# Altium PCB BetaBake_REV_1.0.PcbDoc (part 4 of 8)
Units mil, origin at the board's own origin, x right, y up, seen from the top; angles counter-clockwise.
Board outline 6000 x 4000 mil, 8 copper layers (USB 2.0 (90 Diff) DDR3 Data (50-100), GND (Top Layer high-speed return paths), DDR3 Fly-by Routing (Address, Command, Control), QSPI Flash (Clk, IO), Int4 PWR, Int5 GND (Shielding between L4 and L6), Int6 eMMC High-Speed Data Lines (8-bit bus), SDIO/peripherals, Int7 GND, Escapes, non-critical tracks, decoupling capacitor vias), stack 60.424 mil thick; 426 components, 331 nets, 1941 pads, 428 vias.
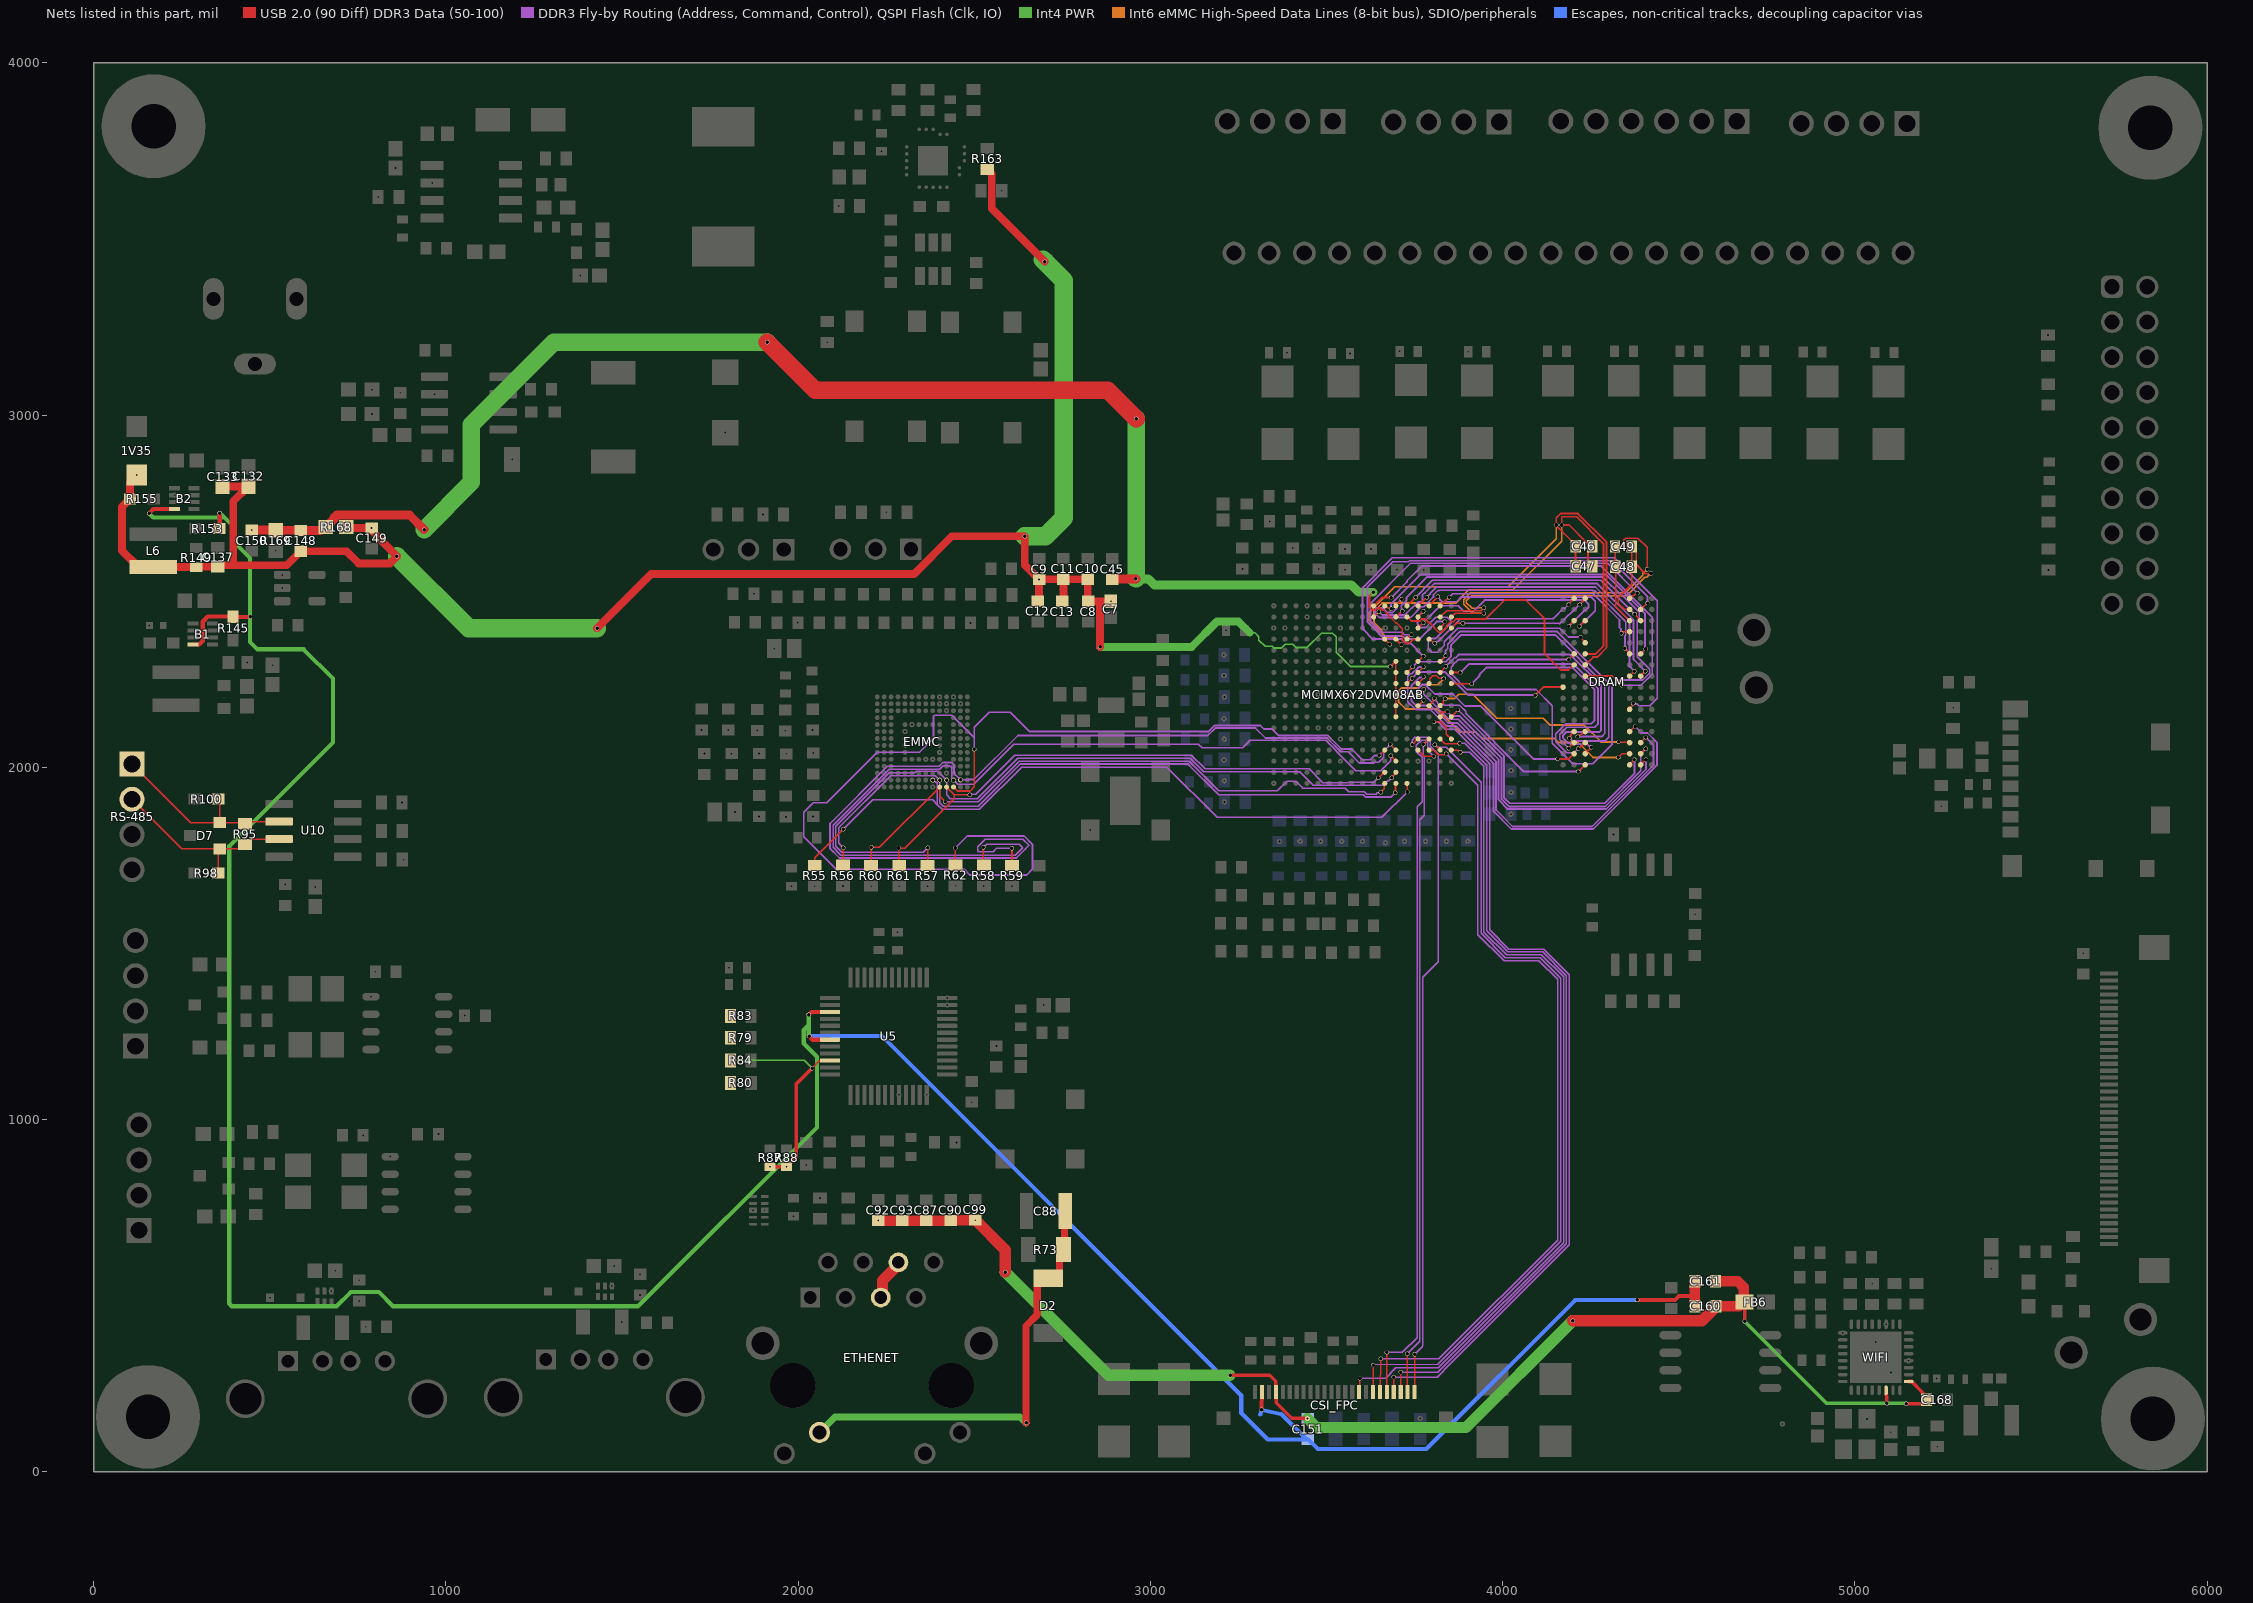
[diagram p9: the nets of this part, all layers, seen from the top]

## Part data (continued)
U13: library part CMP-04919-000038-1, "IC SUPERVISOR 4 CHANNEL 20QFN", Case/Package=QFN, Max Operating Temperature=125°C, Max Output Current=1mA, Max Power Dissipation=2.86W, Max Reset Threshold Voltage=404mV, Max Supply Voltage=6.5V, Min Operating Temperature=-40°C, Min Reset Threshold Voltage=396mV, Min Supply Voltage=1.8V, Nominal Supply Current=13uA, Number of Voltages Monitored=4, Overvoltage Threshold=400mV, Package Quantity=1, Quiescent Current=12uA, Accuracy=0.25%, Height=0.95mm, Lead Free="Lead Free", Length=4.15mm, Mount="Surface Mount", Number of Pins=20, Operating Supply Current=13uA, Packaging="Tape and Reel", Power Dissipation=2.86W, Radiation Hardening=No, REACH SVHC="No SVHC", Reset="Active Low", RoHS Compliant=Yes, Termination=SMD/SMT, Threshold Voltage=400mV, Type="Multi-Voltage Supervisor", Watchdog Timer=Yes, Width=4.15mm
U14: library part CMP-0332-00499-1, "Low Quiescent Current, Programmable-Delay Supervisory Circuit, 1 Supply Monitored, -40 to 125 degC, 6-pin SOT-23 (DBV), Green (RoHS & no Sb/Br)", Manufacturer="Texas Instruments", PartNumber=TPS3808G33DBVTG4, Rating=Catalog, Threshold Voltage 1 (typ)(Typ)(V)=3.07, # of supplies monitored=1, Code_JEDEC=MO-178-AB*, ComponentLink1Description=Datasheet, ComponentLink1URL=http://www.ti.com/general/docs/lit/getliterature.tsp?genericPartNumber=TPS3808G33&fileType=pdf, DatasheetVersion=SBVS050J, Iq(Typ)(uA)=2.4, Mounting Technology="Surface Mount", Output Driver Type / Reset Output="Active-low, Open-drain", PackageDescription="6-Pin Plastic Small-Outline Package, 2.9 x 1.6 mm Body, 0.95 mm Pitch, 2.8 mm Lead Span", PackageReference=DBV6, PackageVersion="revK, Mar-2006", Reset Threshold Accuracy(%)=0.5, SubFamily="Supervisor and Reset IC", Time Delay(ms)=Programmable, VCC(Max)(V)=6.5, VCC(Min)(V)=1.7
U16: library part W25Q32JVSSIQ, "FLASH - NOR Memory IC 32Mb (4M x 8) SPI - Quad I/O 133 MHz 8-SOIC", Package="SOIC-8 Winbond", Check_prices=https://www.snapeda.com/parts/W25Q32JVSSIQ/Winbond+Electronics/view-part/?ref=eda, MF=Winbond, MP=W25Q32JVSSIQ, SnapEDA_Link=https://www.snapeda.com/parts/W25Q32JVSSIQ/Winbond+Electronics/view-part/?ref=snap
U17: "300-mA, high-PSRR, low-IQ, low-dropout voltage regulator with enable", Package="SOT-23-5 Texas Instruments", Check_prices=https://www.snapeda.com/parts/TLV70218DBVT/Texas+Instruments/view-part/?ref=eda, MF="Texas Instruments", MP=TLV70218DBVT, SnapEDA_Link=https://www.snapeda.com/parts/TLV70218DBVT/Texas+Instruments/view-part/?ref=snap
WIFI: library part CMP-2000-07453-1, "Low-Power, Highly-Integrated Wi-Fi Solution, 2.5 to 3.6 V, 80 mA, -40 to 125 degC, 32-Pin QFN", Manufacturer="Espressif Systems", Package Description="32-Pin Quad Falt No-Lead, Body 5 x 5 mm, Pitch 0.5 mm", Package Reference=QFN-32, Datasheet URL=http://espressif.com/sites/default/files/documentation/0a-esp8266ex_datasheet_en.pdf, Datasheet Version="Rev. 5.4, 04/2017", Manufacturer URL=http://espressif.com, Mounting Technology=SurfaceMount
Y1: library part ECS-.327-6-34RR-TR, "32.768kHz 20ppm Crystal 6pF 20 kOhm -40C ~ 85C Surface Mount 2-SMD, No Lead 3.2 x 1.5", Package="ECX-34RR-34RR-2 ECS", Check_prices=https://www.snapeda.com/parts/ECS-.327-6-34RR-TR/ECS/view-part/?ref=eda, MF="ECS Inc.", MP=ECS-.327-6-34RR-TR, SnapEDA_Link=https://www.snapeda.com/parts/ECS-.327-6-34RR-TR/ECS/view-part/?ref=snap
Y3: library part CMP-27762-015775-1, "Crystal 26MHz ±20ppm (Tol) ±30ppm (Stability) 18pF FUND 60Ω 4-Pin SMD T/R", Case/Package=CSMD, ESR (Equivalent Series Resistance)=60R, Frequency=26MHz, Frequency Stability=30ppm, Frequency Tolerance=20ppm, Load Capacitance=18pF, Max Operating Temperature=85°C, Min Operating Temperature=-40°C, Operating Frequency="26 MHz", Package Quantity=1000, Depth=2.5mm, Height=1mm, Lead Free="Lead Free", Length=3.2mm, Mount="Surface Mount", Packaging="Tape and Reel", Series=ABM8G, Termination=SMD/SMT, Tolerance=20ppm, Width=2.5mm

## Free pads (board coordinates)
  round 15 hole 5: 18(544,1667.06) 19(629,1660.16) 21(879.99,1738) 22(875.53,1900) 23(799.47,1420) 24(787,1349) 27(765,955) 28(841.65,895) 29(286.54,1910) 33(436,2298) 34(508,2290.16) 36(158,2403) 43(449,2673.53) 45(535,2546.4) 46(535,2546.4) 49(685.94,571) 50(754,544.06) 54(1499.12,425) 55(1477.94,584) 56(1551.18,561.02) 57(1807.8,1104.17) 58(1807.33,1168.17) 59(1807.33,1232.17) 60(1807.33,1294.17) 61(1987,725.41) 62(2062,777.53) 67(2449.46,935) 69(2423.07,1344.93) 71(2697.43,1325) 73(2286.26,1070.32) 74(1803.41,1431) 75(1981,1662.41) 76(1981,1662.41) 77(2047.12,1662.7) 78(2127.12,1663.17) 79(2207.12,1662.7) 80(2207.12,1662.7) 81(2287.12,1662.7) 82(2367.12,1662.7) 83(2447.12,1663.65) 84(2527.12,1663.17) 85(2607.12,1662.7) 86(2042.17,1860.66) 87(1965.17,1859.13) 88(1889.12,1860.65) 89(1820.37,1872.91) 90(2043.07,2040.74) 92(1963.12,2103.7) 93(1966.07,2038.27) 94(1889.12,2039.23) 95(1884.12,2104.7) 96(1810.8,2038.91) 97(1801.8,2106.38) 98(1725.8,2106.38) 99(1733.8,2038.96) 100(1932,2337) 101(1932,2337) 103(1999,2411) 107(1874.21,2493) 113(2489.21,2410) 117(2684,2533.47) 123(2888,2471.33) 124(789.91,3003.37) 125(789.91,3072.27) 126(870,3063.53) 127(967.76,3059) 130(1793,2950.37) 131(807.47,3619) 132(960.78,3659) 133(857,3701.42) 134(1381,3396) 165(5234,71.47) 180(789,2679.53) 183(122,2830.1) 186(1920,866.41) 187(1967,866.41) 189(5548,3227.53) 190(5550,2560.47) 192(5279,2169.53) 193(5245,1889.47) 196(5648,1472.06) 206(5387,576.45) 211(4794,136) 218(2503,714.47) 222(2227,713.47) 227(4314.68,1809.36) 229(4547,1583) 233(5148,3828) 242(2829,1822) 244(772.47,412) 245(978.53,959) 248(3766,151.53) 249(5088.53,418.81) 251(5152.5,315.46) 252(2249.86,2724.17) 253(2082.68,3206.69) 254(1899.8,2718.17) 255(2115.47,3594) 256(3737,3460) 257(3707.41,3181) 258(3566.59,3175) 259(3387.59,3177) 260(4137,3460) 261(4737,3460) 262(5137,3460) 266(3989.9,3832.06) 267(4665,3834) 268(3518,3834) 269(3902.41,3180) 270(2236.61,3749) 271(2578.06,3637) 272(3446,151.06) 273(229.86,2772.68) 279(1188.07,2874) 280(1053.15,1295.28) 282(2284.5,594.74) 283(2401.6,2200.08) 285(2421.29,2160.7) 286(2440.97,2200.08) 287(2421.29,2180.39) 293(2041,2106) 294(2322.86,2121.33) 295(2303.18,2101.65) 296(2401.6,2042.59) 298(2381.92,2022.91) 302(3700.24,2560.98) 305(3776.24,2559.98) 306(3478.24,2562.93) 307(3478.24,2562.93) 309(3626.24,2560.98) 310(3552.24,2560.98) 311(3261.46,2563.36) 312(3338.47,2698) 314(4965.5,394.2) 315(3476.26,2332.47) 318(3476.26,2112) 321(3476.26,2206.49) 323(4023.76,1928.98) 324(3759.72,2017.51) 329(3901.24,1790.46) 330(3840.24,1790.46) 331(3781.24,1790.46) 332(3721.24,1790.46) 333(3667.24,1785.98) 334(3602.24,1789.98) 335(3543.24,1789.98) 336(3483.24,1790.46) 337(3425.24,1790.46) 338(3366.24,1789.46) 339(4023.53,1867) 340(4023.53,1991) 341(4023.53,2050) 342(4023.53,2109) 343(4023.06,2167) 347(3507.76,2143.5) 348(3507.76,2112) 349(3539.83,2080.5) 351(2023,870.72) 352(1904.87,742.37) 353(1872,742.37) 354(2493,1049.47) 355(2365,1070.32) 356(2563,1209.06) 358(2423.07,1325.24) 359(2282,1531.59) 360(3854.21,1954.52) 361(3791,2017.73) 362(754,485) 363(674.68,513.16) 364(500.69,494) 365(5232.5,264.83) 366(5049.06,534.06) 367(5059,368.61) 368(5102.31,282) 372(2362.23,2022.91) 373(2421.29,1983.54) 374(2381.92,1944.17) 377(2460.66,2180.39) 378(2401.6,2180.39) 379(3413.27,2017.51) 380(3350.28,1954.52) 382(3665.24,2332.47) 383(3539.25,2395.46) 384(3667.56,2395.44) 385(3728.23,2332.47) 386(3728.23,2395.46) 387(3214.82,2389) 388(3208.47,2319) 389(3350.28,2395.46) 390(3381.77,2395.46) 391(3350.28,2458.46) 392(3444.76,2426.96) 393(3444.76,2458.46) 394(3404.24,2623.04) 395(3478.24,2621.98) 396(3552.24,2620.04) 397(3626.24,2620.04) 398(517,2615) 399(535,2509) 400(3208.94,2261) 401(3210,2200) 402(3208.94,2137.99) 403(3209.71,2079.98) 404(3208.94,2020.98) 405(3209.71,1961.98) 406(3210.18,1901.98) 407(5102,112.61) 408(5034.46,150.31) 409(1551.18,501.97) 410(1471,527.32)
  round 12 hole 5: 381(3539.25,2017.51)
  round 295.28 hole 125.98: 411(5839,3816) 412(170,3820) 413(154,156) 414(5846,151)

## Via types
v1: diameter 12, hole 10, USB 2.0 (90 Diff) DDR3 Data (50-100) to Escapes, non-critical tracks, decoupling capacitor vias, 382 vias
v2: diameter 50, hole 26, USB 2.0 (90 Diff) DDR3 Data (50-100) to Escapes, non-critical tracks, decoupling capacitor vias, 28 vias
v3: diameter 19.68, hole 7.87, USB 2.0 (90 Diff) DDR3 Data (50-100) to Escapes, non-critical tracks, decoupling capacitor vias, 9 vias
v4: diameter 23.62, hole 11.81, USB 2.0 (90 Diff) DDR3 Data (50-100) to Escapes, non-critical tracks, decoupling capacitor vias, 5 vias
v5: diameter 7.87, hole 7.87, USB 2.0 (90 Diff) DDR3 Data (50-100) to Escapes, non-critical tracks, decoupling capacitor vias, 4 vias

## Nets (pads, with @x,y where several pads share a name; then routed paths per layer and width w, separated by ;. In a path a pad name is that pad's centre, name@x,y a point inside that pad or via, vN(x,y) a via of type N, cw(c..) or ccw(c..) an arc to the next point about the centre after c; other vN are vias at no path point)
A: D7.2 R95.2 R100.1 RS-485.1 U10.6 | length 560.7
  USB 2.0 (90 Diff) DDR3 Data (50-100) w4: RS-485.1@108.74,2009.45 274.79,1843.4 D7.2@357.37,1843.4 ; R100.1@351.5,1910 R100.1@353.46,1910 357.37,1906.09 D7.2@357.37,1843.4 ; U10.6@526.5,1846.14 436.14,1846.14 R95.2@430,1840 426.6,1843.4 D7.2@357.37,1843.4
AGND: B1.4 B2.4 C151.1 C160.1 C161.2 CSI_FPC.2 R145.1 R153.1 U5.15 U5.19 | length 9065
  USB 2.0 (90 Diff) DDR3 Data (50-100) w12: v1(157,2721) 169.31,2733.31 B2.4@229.86,2733.31 ; B1.4@281.86,2349 281.95,2349.09 299.65,2349.09 309.42,2358.86 309.42,2413.46 323.88,2427.93 R145.1@396,2427.93 396.93,2427 v1(444,2427) ; R153.1@356.46,2678 358,2679.54 v1(358,2722) ; v1(2030,1298) 2037.56,1305.56 U5.15@2090.39,1305.56 ; v1(2031.17,1237.08) 2041.43,1226.82 U5.19@2090.39,1226.82 ; v1(3315.35,176) CSI_FPC.2@3316.94,227 ; v1(4382,488) 4489.25,488 4500.78,499.53 4545.92,499.53
  USB 2.0 (90 Diff) DDR3 Data (50-100) w30: C161.2@4545.69,541 4545.92,540.76 4545.92,499.53 C160.1@4545.92,470
  Int4 PWR w12: v1(157,2721) 169,2709 371,2709 ; v1(358,2722) 371,2709 ; v1(2030,1298) 2030,1268.12 ; v1(2031.17,1237.08) 2030,1238.25 2030,1268.12 ; 371,2709 395,2685 395,2643 444,2594 v1(444,2427) 444,2356 465,2335 596,2335 679,2252 679,2071 385,1777 385,477.03 392.03,470 689.51,470 730.01,510.5 809.5,510.5 850,470 1545.51,470 2053.37,977.86 2053.37,1178.31 2016,1215.68 2016,1254.12 2030,1268.12
  Escapes, non-critical tracks, decoupling capacitor vias w12: v1(2031.17,1237.08) 2237.92,1237.08 3257.84,217.16 3257.84,167.16 3333,92 C151.1@3444.03,92 ; 3311.97,163.03 v1(3315.35,176) 3369.61,163.79 cw(c3366.98,152.08) 3375.46,160.57 C151.1@3444.03,92 ; v1(4382,488) 4206.31,488 3782.97,64.67 3475.3,64.67 3447.97,92 C151.1@3446,92 C151.1@3444.03,92
AVDD: C87.1 C90.2 C92.2 C93.2 C99.2 C151.2 C160.2 C161.1 C168.2 CSI_FPC.4 ETHENET.5 ETHENET.6 FB6.2 pad.57 pad.58 pad.59 pad.60 pad.186 pad.187 pad.218 pad.222 pad.272 pad.282 R79.1 R80.1 R83.2 R84.2 R87.2 R88.2 U5.22 WIFI.1 WIFI.30 | length 4623.2
  USB 2.0 (90 Diff) DDR3 Data (50-100) w4: v1(2039.37,1145.67) 2059.06,1165.35 2087.98,1165.35 U5.22@2090.39,1167.76
  USB 2.0 (90 Diff) DDR3 Data (50-100) w10: R87.2@1920,866.41 R88.2@1967,866.41 1994.85,894.26 1994.85,898.4 1994.85,1068 1994.85,1101.15 v1(2039.37,1145.67) ; v1(3226,274) 3339,274 3356.31,256.68 CSI_FPC.4@3356.31,227 3357.22,226.09 3357.22,195.78 3401,152 3445.06,152 pad.272@3446,151.06 ; v1(4686.68,427.09) 4686.68,481.78 FB6.2@4686.89,482 ; WIFI.30@5088.53,231.8 5088.61,231.72 5088.61,217.08 5090.62,215.07 5090.62,194.52 v1(5091,194.14) ; v1(5146,193) 5192.72,193 5203.47,203.75 C168.2@5203.47,204 5192.72,214.75 5192.72,224.89 5161.2,256.41 WIFI.1@5152.5,256.41
  USB 2.0 (90 Diff) DDR3 Data (50-100) w30: C92.2@2227,713.47 2227.47,713 C93.2@2295,713 C87.1@2364,713 2364.24,713.24 2432.76,713.24 C90.2@2433,713.47 2433.75,714.22 2495.72,714.22 2495.97,714.47 C99.2@2503,714.47 ; C161.1@4604.74,541 4667,541 4684.57,523.43 4684.57,484.32 FB6.2@4686.89,482 4682.01,482 4670.01,470 C160.2@4605.21,470
  USB 2.0 (90 Diff) DDR3 Data (50-100) w32: ETHENET.5@2234.5,494.74 2239.1,499.33 2239.1,542.84 2284.5,588.25 ETHENET.6@2284.5,594.74 ; C99.2@2503,714.47 2588,629.47 v1(2588,567) ; v1(4199,429) 4565.68,429 4605.21,468.54 C160.2@4605.21,470
  Int4 PWR w4: pad.58@1807.33,1168.17 2016.87,1168.17 v1(2039.37,1145.67)
  Int4 PWR w10: v1(4686.68,427.09) 4919.62,194.14 v1(5091,194.14) 5144.32,194.14 5145.46,193 v1(5146,193)
  Int4 PWR w32: v1(2588,567) 2881,274 v1(3226,274) ; pad.272@3446,151.06 3471.03,126.03 3896.03,126.03 v1(4199,429)
B: D7.1 R95.1 R98.1 RS-485.2 U10.7 | length 557.7
  USB 2.0 (90 Diff) DDR3 Data (50-100) w4: RS-485.2@108.74,1909.45 249.59,1768.6 D7.1@357.37,1768.6 ; R98.1@353.46,1700 353.46,1764.69 D7.1@357.37,1768.6 ; U10.7@526.5,1796.14 449.13,1796.14 433.94,1780.94 R95.1@430,1780.94 417.65,1768.6 D7.1@357.37,1768.6
"Chassis GND": C88.2 D2.2 ETHENET.10 R73.2 | length 1278
  USB 2.0 (90 Diff) DDR3 Data (50-100) w20: v1(2647,139) 2647,414.4 2678.66,446.06 2678.66,535 2693.66,550 D2.2@2710,550 2726.34,550 2742.53,566.19 2742.53,620.33 R73.2@2753.2,631 2755.66,633.46 2755.66,737.54 C88.2@2758.12,740
  Int4 PWR w20: ETHENET.10@2060.5,111.74 2104.76,156 2630,156 v1(2647,139)
CSI_DATA0: CSI_FPC.24 MCIMX6Y2DVM08AB.E4 | length 1981.6
  USB 2.0 (90 Diff) DDR3 Data (50-100) w4: v1(3743,2064) 3743.11,2064 3759.61,2080.5 MCIMX6Y2DVM08AB.E4@3759.72,2080.5 ; CSI_FPC.24@3750.02,227 v1(3750,334)
  DDR3 Fly-by Routing (Address, Command, Control), QSPI Flash (Clk, IO) w4: v1(3743,2064) 3743,2077 3751,2085 3786.55,2085 3795,2076.55 3795,2059.34 3817,2037.34 3817,1447.72 3772.91,1403.63 3772.91,358.56 cw(c3768.91,358.56) 3771.74,355.74 v1(3750,334)
CSI_DATA1: CSI_FPC.23 MCIMX6Y2DVM08AB.E3 | length 1881.9
  USB 2.0 (90 Diff) DDR3 Data (50-100) w4: v1(3729,335) 3729.66,334.34 3729.66,227.67 CSI_FPC.23@3730.33,227 ; v1(3775,2065) 3775.36,2065 3790.86,2080.5 MCIMX6Y2DVM08AB.E3@3791.22,2080.5
  DDR3 Fly-by Routing (Address, Command, Control), QSPI Flash (Clk, IO) w4: v1(3729,335) 3763.74,369.74 ccw(c3760.91,372.56) 3764.91,372.56 3764.91,454.59 3764.91,1851.91 3777.22,1864.22 3777.22,2031.14 3775,2033.37 v1(3775,2065)
CSI_DATA2: CSI_FPC.22 MCIMX6Y2DVM08AB.E2 | length 2351.4
  USB 2.0 (90 Diff) DDR3 Data (50-100) w4: CSI_FPC.22@3710.65,227 3711,244.69 v1(3711,283) ; MCIMX6Y2DVM08AB.E2@3822.72,2080.5 3836,2067.22 3876.36,2067.22 v1(3877.83,2068.69)
  DDR3 Fly-by Routing (Address, Command, Control), QSPI Flash (Clk, IO) w4: v1(3711,283) 3816.36,283 3846.68,313.32 4181,647.64 4181,1408.36 4113.36,1476 4014.63,1476 3955,1535.63 3955,2006.34 3892.67,2068.67 v1@3877.86,2068.67
CSI_DATA3: CSI_FPC.21 MCIMX6Y2DVM08AB.E1 | length 2500
  USB 2.0 (90 Diff) DDR3 Data (50-100) w4: CSI_FPC.21@3690.96,227 v1(3691,269) ; v1(3805,2129) 3824.5,2129 3840.2,2113.3 3840.2,2094.51 MCIMX6Y2DVM08AB.E1@3854.21,2080.5
  DDR3 Fly-by Routing (Address, Command, Control), QSPI Flash (Clk, IO) w4: v1(3691,269) 3813.67,269 3852.33,307.67 4189,644.33 4189,1411.67 4116.67,1484 4017.94,1484 3963,1538.94 3963,2009.65 3864,2108.65 3837.45,2108.65 3817.11,2129 v1(3805,2129)
CSI_DATA4: CSI_FPC.20 MCIMX6Y2DVM08AB.D4 | length 2049.3
  USB 2.0 (90 Diff) DDR3 Data (50-100) w4: 3670.89,325 3671.2,244.69 CSI_FPC.20@3671.28,227 ; 3670.89,325.05 v1(3671,339) ; MCIMX6Y2DVM08AB.D4@3759.72,2048.87 MCIMX6Y2DVM08AB.D4@3759.72,2049.01 3777.73,2031 v1(3805,2031)
  DDR3 Fly-by Routing (Address, Command, Control), QSPI Flash (Clk, IO) w4: v1(3671,339) 3715,339 3756.91,380.91 3756.91,391.56 3756.91,457.91 3756.91,1888.42 3771.22,1902.74 3771.22,2028.66 3755.15,2044.73 3755.15,2062.12 3770.03,2077 3779.97,2077 3787,2069.97 3787,2049 v1(3805,2031)
CSI_DATA5: CSI_FPC.19 MCIMX6Y2DVM08AB.D3 | length 2364.9
  USB 2.0 (90 Diff) DDR3 Data (50-100) w4: CSI_FPC.19@3651.59,227 3651.85,227.26 ccw(c3649.02,230.08) 3653.02,230.04 v1(3654,321) ; MCIMX6Y2DVM08AB.D3@3791.22,2046.89 MCIMX6Y2DVM08AB.D3@3791.22,2049.01 3805.99,2049.01 3809.43,2045.57 3809.43,2043.51 3817.21,2035.72 3834.5,2035.72 3837.88,2039.1 v1(3840.05,2039.1)
  DDR3 Fly-by Routing (Address, Command, Control), QSPI Flash (Clk, IO) w4: v1(3654,321) 3819,321 3829,331 4156,658 4156,1398 4103,1451 4004.27,1451 3930,1525.27 3930,1949.32 3850.03,2029.29 ; v1(3840.05,2039.1) 3849.99,2029.32
CSI_DATA6: CSI_FPC.18 MCIMX6Y2DVM08AB.D2 | length 2406.3
  USB 2.0 (90 Diff) DDR3 Data (50-100) w4: CSI_FPC.18@3631.91,227 3631.95,227.05 v1(3632,303) v1(3632,303) ; v1(3807,2064.31) 3807.21,2064.31 3822.51,2049.01 MCIMX6Y2DVM08AB.D2@3822.72,2049.01
  DDR3 Fly-by Routing (Address, Command, Control), QSPI Flash (Clk, IO) w4: v1@3631.99,304.11 3814.38,305.27 ccw(c3814.34,309.27) 3817.17,306.44 3835.36,324.64 4165,654.27 4165,1401.73 4106.73,1460 4008,1460 3939,1529 3939,1957.39 3839.61,2056.79 3815.38,2056.79 3807.85,2064.31 v1(3807,2064.31)
CSI_DATA7: CSI_FPC.16 MCIMX6Y2DVM08AB.D1 | length 2391.8
  USB 2.0 (90 Diff) DDR3 Data (50-100) w4: CSI_FPC.16@3592.54,227 3593.85,228.31 3593.85,251 cw(c3597.85,251) 3593.86,251.33 v1(3595,265) ; MCIMX6Y2DVM08AB.D1@3854.21,2049.01 3871.83,2049.01 3877.84,2043 v1(3880,2043)
  DDR3 Fly-by Routing (Address, Command, Control), QSPI Flash (Clk, IO) w4: v1(3595,265) 3596,266 3668,266 3697,295 3817.04,295 3841.02,318.98 4173,650.96 4173,1405.04 4110.04,1468 4011.31,1468 3947,1532.31 3947,1780.31 3947,2003 3907,2043 v1(3880,2043)
DRAM_1V35: 1V35.2 C7.1 C8.1 C9.1 C10.1 C11.1 C12.1 C13.1 C132.2 C133.2 C137.2 C148.2 C149.1 L6.2 MCIMX6Y2DVM08AB.G6 MCIMX6Y2DVM08AB.H6 MCIMX6Y2DVM08AB.J6 MCIMX6Y2DVM08AB.K6 MCIMX6Y2DVM08AB.L6 MCIMX6Y2DVM08AB.M6 pad.117 pad.123 pad.180 pad.183 R149.2 R155.2 R163.1 R168.2 | length 6676
  USB 2.0 (90 Diff) DDR3 Data (50-100) w4: C133.2@366,2797.42 C133.2@382.42,2781
  USB 2.0 (90 Diff) DDR3 Data (50-100) w5: v1@3680,2286 v1(3680.88,2286) 3681.32,2286 3696.29,2300.98 MCIMX6Y2DVM08AB.M6@3696.73,2300.98 MCIMX6Y2DVM08AB.L6@3696.73,2269.48 MCIMX6Y2DVM08AB.K6@3696.73,2237.98 MCIMX6Y2DVM08AB.J6@3696.73,2206.49 MCIMX6Y2DVM08AB.H6@3696.73,2174.99 MCIMX6Y2DVM08AB.G6@3696.73,2143.5
  USB 2.0 (90 Diff) DDR3 Data (50-100) w22: 1V35.2@122,2830.1 103,2811.1 R155.2@103,2762 80.42,2739.42 80.42,2615.35 127.07,2568.69 L6.2@169,2568.69 290.19,2568.69 R149.2@291,2567.88 292.54,2569.43 C137.2@352,2569.43 353.97,2569.43 358.07,2573.53 396,2573.53 ; C133.2@366,2797.42 C132.2@438,2797.42 ; C132.2@439,2798.42 C132.2@438,2797.42 ; R168.2@716.94,2682 719.41,2679.53 C149.1@789,2679.53 789,2672.32 819.72,2641.61 819.72,2640.28 v1(861,2599) 841,2579 752,2579 717.53,2613.47 C148.2@588,2613.47 548.06,2573.53 396,2573.53 ; v1(1429,2395) 1583,2549 2329.1,2549 2436.1,2656 v1(2643,2656) 2643,2574.47 C9.1@2684,2533.47 ; R163.1@2536.61,3697.59 2540.55,3697.59 2545.29,3692.84 2545.29,3688.91 2549.31,3684.89 2549.31,3586.69 v1(2700,3436) ; C12.1@2680,2472 2684,2476 C9.1@2684,2533.47 ; C13.1@2750,2471.53 2753,2474.53 C11.1@2753,2533.94 ; v1(2857,2342) 2857,2467.06 2852.53,2471.53 ; C7.1@2888,2471.33 2887.8,2471.53 2852.53,2471.53 ; 396,2573.53 396,2755.42 C132.2@438,2797.42 ; C9.1@2684,2533.47 2684.47,2533.94 C11.1@2753,2533.94 ; C11.1@2753,2533.94 2821.94,2533.94 C10.1@2822,2534 2822,2472.53 C8.1@2823,2471.53 2852.53,2471.53
  Int4 PWR w5: 3281.75,2382 3297,2382 3307.83,2371.17 3307.83,2361.33 3325.65,2343.5 3346,2343.5 3351,2338.5 3371.35,2338.5 3382.35,2349.5 3404.1,2349.5 3413.05,2340.55 3445.22,2340.55 3485.66,2380.99 3517.01,2380.99 3527.64,2370.36 3527.64,2327.11 3568.75,2286 v1(3680.88,2286)
  Int4 PWR w22: v1(2857,2342) 3116.91,2342 ; 3157,2382 3117,2342 3116.91,2342 ; 3281.75,2382 3249.75,2414 3188.91,2414 3116.91,2342
  Int4 PWR w52: v1(861,2599) 1065,2395 v1(1429,2395) ; v1(2643,2656) 2702,2656 2754,2708 2754,3382 v1(2700,3436) ; 2694,3442 v1(2700,3436) ; v1@2702,3436 v1(2700,3436)
DRAM_ADDR0: DRAM.N3 MCIMX6Y2DVM08AB.L5 | length 928.3
  USB 2.0 (90 Diff) DDR3 Data (50-100) w5.12: MCIMX6Y2DVM08AB.L5@3728.23,2269.48 3728.85,2269.48 3744.37,2285 v1(3745,2285) ; v1(4213.31,2087.24) DRAM.N3@4234.39,2101.75
  DDR3 Fly-by Routing (Address, Command, Control), QSPI Flash (Clk, IO) w5.12: v1(3745,2285) 3745,2286 3758.56,2299.56 3838.32,2299.56 3853.12,2314.36 3853.12,2346.22 3882.89,2376 4149,2376 4150.47,2374.53 4288.52,2236.48 cw(c4284.88,2232.88) 4290,2232.88 4290,2096 4281.24,2087.24 v1(4213.31,2087.24)
DRAM_ADDR1: DRAM.P7 MCIMX6Y2DVM08AB.H2 | length 614.4
  USB 2.0 (90 Diff) DDR3 Data (50-100) w5.12: MCIMX6Y2DVM08AB.H2@3822.72,2174.99 3831.25,2183.53 3831.25,2187.51 3836.94,2193.2 v1(3836.94,2195.06) ; v1(4329,2072) 4329.87,2071.13 4359.5,2071.13 DRAM.P7@4360.37,2070.25 DRAM.P7@4363.24,2070.25
  Int6 eMMC High-Speed Data Lines (8-bit bus), SDIO/peripherals w5.12: v1(3836.94,2195.06) 3863.34,2195.06 3875.96,2207.68 3915.27,2207.68 3983.61,2139.34 4115.3,2139.34 4134.66,2119.98 4231.57,2119.98 4279.55,2072 v1(4329,2072)
DRAM_ADDR2: DRAM.P3 MCIMX6Y2DVM08AB.K1 | length 801.7
  USB 2.0 (90 Diff) DDR3 Data (50-100) w5.12: MCIMX6Y2DVM08AB.K1@3854.94,2238.71 3854.94,2237.98 MCIMX6Y2DVM08AB.K1@3854.21,2237.98 3854.7,2237.49 3911.51,2237.49 v1(3912,2237) ; v1(4214,2053) 4215.57,2053 4232.82,2070.25 DRAM.P3@4234.39,2070.25
  DDR3 Fly-by Routing (Address, Command, Control), QSPI Flash (Clk, IO) w5.12: v1(3912,2237) 3934.16,2259.16 3934.16,2263.04 3955,2283.88 4198.12,2283.88 4261.16,2220.84 4261.16,2133.16 4252,2124 4179.21,2124 4151,2095.79 4151,2072.24 4182,2041.24 4202.24,2041.24 v1(4214,2053)
DRAM_ADDR3: DRAM.N2 MCIMX6Y2DVM08AB.M2 | length 887.3
  USB 2.0 (90 Diff) DDR3 Data (50-100) w5.12: MCIMX6Y2DVM08AB.M2@3822.72,2300.98 3822.72,2301.35 3838,2316.63 v1(3838,2317) ; v1(4189.28,2083.06) 4189.28,2084.92 4193.82,2089.46 4193.82,2092.61 DRAM.N2@4202.89,2101.75 DRAM.N2@4202.89,2101.75
  DDR3 Fly-by Routing (Address, Command, Control), QSPI Flash (Clk, IO) w5.12: v1(3838,2317) 3838,2331.43 3844,2337.43 3844,2350 3879.88,2385.88 4153.36,2385.88 4301,2238.24 4301,2086 4289.68,2074.68 4199.52,2074.68 4191.14,2083.06 v1(4189.28,2083.06)
DRAM_ADDR4: DRAM.P8 MCIMX6Y2DVM08AB.K4 | length 1208.7
  USB 2.0 (90 Diff) DDR3 Data (50-100) w5.12: MCIMX6Y2DVM08AB.K4@3759.72,2237.98 3759.85,2237.98 3773.68,2251.81 3773.68,2255.36 v1(3775,2256.68) ; DRAM.P8@4391.87,2070.25 4391.87,2070.56 4406,2084.69 v1(4406,2085)
  DDR3 Fly-by Routing (Address, Command, Control), QSPI Flash (Clk, IO) w5.12: v1(3775,2256.68) 3773.68,2255.36 3764.36,2255.36 3741,2232 3741,2221 3741,2189.44 3755.26,2175.17 3795.93,2175.17 3844.78,2126.33 3871.33,2126.33 3981.25,2016.41 3981.25,1878.81 4027.95,1832.12 4254.05,1832.12 4428.68,2006.74 4428.68,2062.32 v1(4406,2085)
DRAM_ADDR5: DRAM.P2 MCIMX6Y2DVM08AB.L1 | length 750.3
  USB 2.0 (90 Diff) DDR3 Data (50-100) w5.12: MCIMX6Y2DVM08AB.L1@3854.35,2269.48 MCIMX6Y2DVM08AB.L1@3854.21,2269.48 3854.45,2269.24 3879.76,2269.24 v1(3880,2269) ; v1(4187,2054) 4187,2054.18 4202.89,2070.07 DRAM.P2@4202.89,2070.25
  DDR3 Fly-by Routing (Address, Command, Control), QSPI Flash (Clk, IO) w5.12: v1(3880,2269) 3904,2293 4202,2293 4270.28,2224.72 4270.28,2122.28 4262,2114 4182.11,2114 4161.88,2093.78 4161.88,2079.12 v1(4187,2054)
DRAM_ADDR6: DRAM.R8 MCIMX6Y2DVM08AB.G2 | length 891.1
  USB 2.0 (90 Diff) DDR3 Data (50-100) w5.12: MCIMX6Y2DVM08AB.G2@3822.72,2143.5 3822.72,2151.5 cw(c3827.83,2151.46) 3826.72,2156.46 ccw(c3822.72,2174.99) 3828.16,2156.83 cw(c3829.59,2151.91) 3829.56,2157.03 3842.09,2157.03 v1(3843.41,2158.35) ; DRAM.R8@4391.87,2038.76 DRAM.R8@4391.87,2038.76 4406,2052.95 v1(4406,2053)
  DDR3 Fly-by Routing (Address, Command, Control), QSPI Flash (Clk, IO) w5.12: v1(3843.41,2158.35) 3856.31,2145.45 3878,2145.45 3996.33,2027.12 3996.33,1911.27 4018.91,1888.68 4290.49,1888.68 4391.84,1990.04 4391.84,2038.84 v1(4406,2053)
DRAM_ADDR7: DRAM.R2 MCIMX6Y2DVM08AB.H4 | length 603.7
  USB 2.0 (90 Diff) DDR3 Data (50-100) w5.12: MCIMX6Y2DVM08AB.H4@3759.72,2174.99 3759.86,2174.99 MCIMX6Y2DVM08AB.H4@3764.07,2179.21 ; MCIMX6Y2DVM08AB.H4@3764.1,2179.23 v1(3775.62,2190.62) ; v1(4156,2024) 4188.13,2024 4202.82,2038.69 4202.82,2038.76 DRAM.R2@4202.89,2038.76
  DDR3 Fly-by Routing (Address, Command, Control), QSPI Flash (Clk, IO) w5.12: v1(3775.62,2190.62) 3759.24,2207 3759.24,2223 3771.24,2235 3780.76,2235 3807.52,2208.25 3858.75,2208.25 3893,2174 3937.36,2174 4087.36,2024 v1(4156,2024)
DRAM_ADDR8: DRAM.T8 MCIMX6Y2DVM08AB.J4 | length 965
  USB 2.0 (90 Diff) DDR3 Data (50-100) w5.12: MCIMX6Y2DVM08AB.J4@3759.72,2206.49 3760.11,2206.49 3775.62,2222 v1(3776,2222) ; DRAM.T8@4391.87,2007.26 4392.06,2007.26 4406.8,2022 v1(4407,2022)
  DDR3 Fly-by Routing (Address, Command, Control), QSPI Flash (Clk, IO) w5.12: v1(3776,2222) 3776,2208 3800.87,2183.13 3847.67,2136.33 3874.22,2136.33 3988.37,2022.18 3988.37,1907.91 4014.71,1881.57 4293.43,1881.57 4407,1995.13 v1(4407,2022)
DRAM_ADDR9: DRAM.R3 MCIMX6Y2DVM08AB.L2 | length 880.4
  USB 2.0 (90 Diff) DDR3 Data (50-100) w5.12: MCIMX6Y2DVM08AB.L2@3822.72,2269.48 3823.1,2269.48 3828.33,2274.71 ccw(c3824.72,2278.34) 3828.58,2274.98 v1(3839,2287) ; DRAM.R3@4233.57,2038.76 DRAM.R3@4234.39,2038.76 4235.81,2038.76 4235.81,2041 4251,2056.19 v1(4251,2057)
  DDR3 Fly-by Routing (Address, Command, Control), QSPI Flash (Clk, IO) w5.12: v1(3839,2287) 3863.39,2311.39 3866.27,2311.39 3874.88,2320 4189.99,2320 cw(c4189.99,2314.88) 4193.6,2318.5 4279.4,2232.7 4279.4,2105.4 4274,2100 4181,2100 4171,2090 4171,2083.58 4185.86,2068.72 4190.72,2068.72 4193.88,2065.56 4240.58,2065.56 4249.14,2057 v1(4251,2057)
DRAM_ADDR10: DRAM.L7 MCIMX6Y2DVM08AB.M4 | length 1643.4
  USB 2.0 (90 Diff) DDR3 Data (50-100) w5.12: MCIMX6Y2DVM08AB.M4@3759.72,2300.98 3759.85,2300.98 3774.87,2316 v1(3775,2316) ; DRAM.L7@4360.37,2164.74 4360.37,2167.61 4369.15,2176.39 4369.15,2180.18 v1(4370.47,2181.5)
  DDR3 Fly-by Routing (Address, Command, Control), QSPI Flash (Clk, IO) w5.12: v1(3775,2316) 3739,2352 3725.78,2352 3713.55,2364.23 3631.68,2364.23 3602.24,2393.67 3602.24,2510.24 3687.01,2595 4317,2595 4439,2473 4439,2196 4417.84,2174.84 4386.7,2174.84 4381.36,2180.18 4371.78,2180.18 v1(4370.47,2181.5)
DRAM_ADDR11: DRAM.R7 MCIMX6Y2DVM08AB.K3 | length 961.6
  USB 2.0 (90 Diff) DDR3 Data (50-100) w5.12: MCIMX6Y2DVM08AB.K3@3791.22,2237.98 3793.03,2239.79 3793.03,2251.71 3801.32,2260 3812.23,2260 3819.32,2252.9 3832.1,2252.9 v1(3833,2252) ; v1(4328,2028) 4338.76,2038.76 DRAM.R7@4360.37,2038.76
  Int6 eMMC High-Speed Data Lines (8-bit bus), SDIO/peripherals w5.12: v1(3833,2252) 3815.56,2234.56 3770.8,2234.56 3761.68,2225.44 3713,2225.44 3704.12,2216.56 3704.12,2185.8 3724.12,2165.79 3813.31,2165.79 3879.74,2099.37 3924.08,2099.37 3941.5,2081.95 4147.69,2081.95 4159.14,2070.5 4214.26,2070.5 4256.76,2028 v1(4328,2028)
DRAM_ADDR12: DRAM.N7 MCIMX6Y2DVM08AB.L4 | length 1326.6
  USB 2.0 (90 Diff) DDR3 Data (50-100) w5.12: MCIMX6Y2DVM08AB.L4@3759.72,2269.48 3759.72,2269.6 3775,2284.88 v1(3775,2285) ; DRAM.N7@4360.37,2101.75 4361.06,2101.75 4375.31,2116 v1(4376,2116)
  DDR3 Fly-by Routing (Address, Command, Control), QSPI Flash (Clk, IO) w5.12: v1(3775,2285) ccw(c3775.27,2283.96) 3774.93,2284.98 cw(c3773.33,2289.84) 3773.36,2284.72 3763.6,2284.72 ccw(c3763.6,2279.61) 3760,2283.24 3742.32,2265.56 3737.8,2265.56 3730.44,2258.2 3730.44,2240.37 3730.72,2240.1 3730.72,2186.82 3753.27,2164.27 3793.94,2164.27 3841,2117.21 3867.55,2117.21 3869.86,2114.9 3974.13,2010.63 3974.13,1875.87 4025,1825 4257,1825 4437.8,2005.8 4437.8,2070.97 4411.2,2097.56 4394.44,2097.56 v1(4376,2116)
DRAM_ADDR13: DRAM.T3 MCIMX6Y2DVM08AB.H3 | length 554.6
  USB 2.0 (90 Diff) DDR3 Data (50-100) w5.12: MCIMX6Y2DVM08AB.H3@3791.22,2174.99 3791.22,2175.97 3804.76,2189.5 3804.76,2194.37 v1(3806.07,2195.69) ; v1(4214.38,1987.85) 4214.68,1987.85 4234.09,2007.26 DRAM.T3@4234.39,2007.26
  DDR3 Fly-by Routing (Address, Command, Control), QSPI Flash (Clk, IO) w5.12: v1(3806.07,2195.69) 3809.24,2192.52 cw(c3805.62,2188.9) 3809.97,2191.59 3815.69,2182.34 3817.52,2179.38 3817.89,2179 3832.24,2179 3834.68,2176.56 3877.55,2176.56 3895.21,2158.89 3895.21,2153 4060.36,1987.85 v1(4214.38,1987.85)
DRAM_ADDR14: DRAM.T7 MCIMX6Y2DVM08AB.G1 | length 802.7
  USB 2.0 (90 Diff) DDR3 Data (50-100) w5.12: MCIMX6Y2DVM08AB.G1@3854.21,2143.5 3854.35,2143.5 3862.57,2151.71 ccw(c3858.95,2155.33) 3862.71,2151.85 v1(3873.17,2163.17) ; DRAM.T7@4360.37,2007.26 4360.37,2007.82 4374,2021.45 v1(4374,2022)
  DDR3 Fly-by Routing (Address, Command, Control), QSPI Flash (Clk, IO) w5.12: v1(3873.17,2163.17) 4003.44,2032.9 4003.44,1914.22 4019.75,1897.91 4289.64,1897.91 4374,1982.27 v1(4374,2022)
DRAM_ADDR15: DRAM.J1 MCIMX6Y2DVM08AB.K5 | length 500
  USB 2.0 (90 Diff) DDR3 Data (50-100) w5.12: MCIMX6Y2DVM08AB.K5@3732.93,2242.31 cw(c3729.22,2245.83) 3732.83,2242.21 3728.61,2237.98 MCIMX6Y2DVM08AB.K5@3728.23,2237.98 3728.23,2238.11 3743,2252.88 v1(3743,2253) ; v1(4093,2205) 4115.73,2227.73 DRAM.J1@4171.39,2227.73
  DDR3 Fly-by Routing (Address, Command, Control), QSPI Flash (Clk, IO) w5.12: v1(3743,2253) 3759.5,2269.5 cw(c3763.12,2265.88) 3763.12,2271 3835.76,2271 3901.76,2205 v1(4093,2205)
DRAM_DATA0: DRAM.E3 MCIMX6Y2DVM08AB.T4 | length 796.9
  USB 2.0 (90 Diff) DDR3 Data (50-100) w5.12: MCIMX6Y2DVM08AB.T4@3759.72,2426.96 3763.94,2431.38 ccw(c3760.23,2434.91) 3764,2431.45 v1(3774.94,2443.35) ; v1(4221,2370) 4221,2368.55 4234.39,2355.17 DRAM.E3@4234.39,2353.72 DRAM.E3@4234.39,2353.55
  DDR3 Fly-by Routing (Address, Command, Control), QSPI Flash (Clk, IO) w5.12: v1(3774.94,2443.35) v1(3774.94,2443.35) 3758,2426.34 3758,2408 3769,2397 3781,2397 3810.35,2426.35 3842.65,2426.35 3853,2416 3853,2409 3810,2366 3796,2366 3789,2359 3789,2337 3799,2327 3815,2327 3834,2346 3834,2356 3873,2395 4162,2395 4187,2370 v1(4221,2370)
DRAM_DATA1: DRAM.F7 MCIMX6Y2DVM08AB.U6 | length 1026.7
  USB 2.0 (90 Diff) DDR3 Data (50-100) w5.12: MCIMX6Y2DVM08AB.U6@3697.09,2458.46 MCIMX6Y2DVM08AB.U6@3696.73,2458.46 3696.73,2459.59 3713,2475.86 v1(3713,2477) ; v1(4347,2338) DRAM.F7@4360.37,2322.22
  DDR3 Fly-by Routing (Address, Command, Control), QSPI Flash (Clk, IO) w5.12: v1(3713,2477) 3699.69,2463.69 3699.69,2451.56 3687.69,2439.56 3672.16,2439.56 3659.16,2452.56 3643.63,2452.56 3637.44,2446.37 3637.44,2437.63 3649.74,2425.32 3738.89,2425.32 3769.47,2455.91 3775.67,2455.91 3803.6,2483.84 3803.6,2490.03 3815.06,2501.5 3818.4,2501.5 cw(c3822.01,2497.88) 3822.02,2502.99 4254.91,2502.12 cw(c4254.88,2487.88) 4264.98,2497.91 4349.72,2413.18 4349.72,2375.64 4347,2372.93 v1(4347,2338)
DRAM_DATA2: DRAM.F2 MCIMX6Y2DVM08AB.T6 | length 2304.3
  USB 2.0 (90 Diff) DDR3 Data (50-100) w5.12: MCIMX6Y2DVM08AB.T6@3696.73,2426.96 3697.43,2426.96 3714.1,2443.63 v1(3714.8,2443.63) ; v1(4187,2306) 4187,2306.17 4202.89,2322.06 DRAM.F2@4202.89,2322.22
  DDR3 Fly-by Routing (Address, Command, Control), QSPI Flash (Clk, IO) w5.12: v1(3714.8,2443.63) 3714.11,2444.32 3714.11,2451.66 3712.32,2453.44 3712.32,2458.56 3726.88,2473.12 3726.88,2482.08 3785.05,2540.25 4284.75,2540.25 4337.9,2487.1 4340.66,2487.1 4387.56,2440.2 4387.56,2422.56 4382,2417 4382,2314 4417.56,2278.44 4417.56,2267.8 4397.76,2248 4330,2248 4310.12,2228.12 4310.12,2064.36 4256.16,2010.4 4199.6,2010.4 4141,2069 4141,2174.76 4094.76,2221 3898.66,2221 3854,2265.66 3854,2284 3858.67,2288.67 3858.67,2290.9 3872.27,2304.5 cw(c3875.89,2300.88) 3875.89,2306 v1(4187,2306)
DRAM_DATA3: DRAM.F8 MCIMX6Y2DVM08AB.U7 | length 958
  USB 2.0 (90 Diff) DDR3 Data (50-100) w5.12: MCIMX6Y2DVM08AB.U7@3665.24,2458.46 3667.79,2458.46 3674.81,2451.43 3682,2451.43 v1(3683.32,2450.12) ; DRAM.F8@4391.87,2322.22 4392.04,2322.22 4405.82,2336 v1(4406,2336)
  DDR3 Fly-by Routing (Address, Command, Control), QSPI Flash (Clk, IO) w5.12: v1(3683.32,2450.12) 3683.32,2464.29 3766.4,2547.37 4293.63,2547.37 4403.88,2437.12 4403.88,2352.24 ; 4403.88,2352.22 4403.92,2340.19 ccw(c4409.04,2340.2) 4405.4,2336.6 v1(4406,2336)
DRAM_DATA4: DRAM.H3 MCIMX6Y2DVM08AB.U8 | length 1275.8
  USB 2.0 (90 Diff) DDR3 Data (50-100) w5.12: MCIMX6Y2DVM08AB.U8@3633.74,2458.46 3657.28,2482 v1(3684,2482) ; DRAM.H3@4234.39,2259.23 4311.77,2259.23 v1(4338,2233)
  DDR3 Fly-by Routing (Address, Command, Control), QSPI Flash (Clk, IO) w5.12: v1(3684,2482) 3728.28,2526.28 3728.28,2529.08 3771.24,2572.04 4279.02,2572.04 4424.68,2426.39 4424.68,2264.85 4392.83,2233 v1(4338,2233)
DRAM_DATA5: DRAM.H8 MCIMX6Y2DVM08AB.T8 | length 1015.2
  USB 2.0 (90 Diff) DDR3 Data (50-100) w5.12: MCIMX6Y2DVM08AB.T8@3633.74,2426.96 v1(3648.4,2441.6) ; DRAM.H8@4391.87,2259.23 4391.87,2259.55 4405,2272.68 v1(4405,2273)
  DDR3 Fly-by Routing (Address, Command, Control), QSPI Flash (Clk, IO) w5.12: v1(3648.4,2441.6) 3649.42,2441.6 3658.58,2432.44 3722.44,2432.44 3757.52,2467.52 cw(c3761.12,2463.88) 3761.12,2469 3768,2469 3772.44,2473.44 3772.44,2489.44 3778,2495 3779.24,2495 3806.12,2521.88 4268,2521.88 4268.65,2521.24 4371.45,2418.45 4371.45,2306.55 v1(4405,2273)
DRAM_DATA6: DRAM.G2 MCIMX6Y2DVM08AB.T5 | length 686
  USB 2.0 (90 Diff) DDR3 Data (50-100) w5.12: MCIMX6Y2DVM08AB.T5@3728.23,2426.96 3729.86,2426.96 3741.7,2415.12 3764.63,2415.12 3770.85,2421.34 3780.1,2421.34 3790.58,2410.85 3792.58,2410.85 3805.2,2398.24 3805.2,2396.24 3817.81,2383.62 3827.62,2383.62 3840.37,2396.37 3840.37,2401.2 3852.29,2413.12 3859.95,2413.12 3868.39,2421.56 3952.56,2421.56 4006,2475 4066,2475 4119,2422 4119,2322.72 4165.42,2276.3 4186.67,2276.3 4201.09,2290.72 DRAM.G2@4202.89,2290.72
DRAM_DATA7: DRAM.H7 MCIMX6Y2DVM08AB.U4 | length 830.8
  USB 2.0 (90 Diff) DDR3 Data (50-100) w5.12: MCIMX6Y2DVM08AB.U4@3759.72,2458.46 3760.09,2458.46 3773.34,2471.7 cw(c3776.96,2468.09) 3773.4,2471.77 v1(3785,2483) ; DRAM.H7@4360.37,2259.23 4360.37,2259.3 4374,2272.93 v1(4374,2273)
  DDR3 Fly-by Routing (Address, Command, Control), QSPI Flash (Clk, IO) w5.12: v1(3785,2483) 3794.48,2492.48 3794.48,2493.81 3811.91,2511.25 3814.36,2511.25 ccw(c3814.36,2516.36) 3815.06,2511.29 3820.07,2511.98 cw(c3822.01,2497.88) 3822.01,2512.12 4263.67,2512.12 4360.37,2415.42 4360.37,2286.63 v1(4374,2273)
DRAM_DATA8: DRAM.D7 MCIMX6Y2DVM08AB.U2 | length 621.3
  USB 2.0 (90 Diff) DDR3 Data (50-100) w5.12: MCIMX6Y2DVM08AB.U2@3822.72,2458.46 3822.72,2458.59 3834.03,2469.9 cw(c3837.64,2466.27) 3834.14,2470 3847.72,2482.74 v1@3848,2482.46 ; v1@4337.12,2380.88 4337.12,2385.03 DRAM.D7@4359.77,2385.21 ; DRAM.D7@4359.81,2385.21 DRAM.D7@4360.37,2385.21
  DDR3 Fly-by Routing (Address, Command, Control), QSPI Flash (Clk, IO) w5.12: v1(3848,2482.44) 3858.56,2493 4254.88,2493 cw(c4254.88,2487.88) 4258.5,2491.5 4331.68,2418.32 4331.68,2397.08 4335.84,2392.92 4335.84,2382.16 v1(4337.16,2380.84)
DRAM_DATA9: DRAM.C3 MCIMX6Y2DVM08AB.U3 | length 615.7
  USB 2.0 (90 Diff) DDR3 Data (50-100) w5.12: MCIMX6Y2DVM08AB.U3@3791.22,2458.46 3791.22,2458.84 3799.76,2467.37 3799.76,2468.43 v1(3816.16,2484.83) ; v1(4218,2400) 4218,2400.16 4234.39,2416.55 DRAM.C3@4234.39,2416.71
  DDR3 Fly-by Routing (Address, Command, Control), QSPI Flash (Clk, IO) w5.12: v1(3816.16,2484.83) 3816.16,2482.97 3822.56,2476.57 3822.56,2475.51 3828.19,2469.88 3868.88,2469.88 3882.88,2483.88 4250.12,2483.88 4263,2471 4263,2445 v1(4218,2400)
DRAM_DATA10: DRAM.C8 MCIMX6Y2DVM08AB.U5 | length 741.9
  USB 2.0 (90 Diff) DDR3 Data (50-100) w5.12: MCIMX6Y2DVM08AB.U5@3728.23,2458.46 3728.34,2458.46 3741.46,2471.58 ; 3741.49,2471.6 v1(3753,2483) ; v1(4375,2435) 4375,2434.29 4391.87,2417.42 DRAM.C8@4391.87,2416.71 DRAM.C8@4392.29,2416.71
  DDR3 Fly-by Routing (Address, Command, Control), QSPI Flash (Clk, IO) w5.12: v1@3753,2483.36 3799.15,2529.5 cw(c3802.76,2525.88) 3802.76,2531 4279,2531 v1(4375,2435)
DRAM_DATA11: DRAM.C2 MCIMX6Y2DVM08AB.R4 | length 643.7
  USB 2.0 (90 Diff) DDR3 Data (50-100) w5.12: MCIMX6Y2DVM08AB.R4@3759.72,2395.46 3759.82,2395.46 3775.13,2410.78 v1(3775.22,2410.78) ; v1(4188,2401) 4188,2401.41 4202.89,2416.3 DRAM.C2@4202.89,2416.71
  DDR3 Fly-by Routing (Address, Command, Control), QSPI Flash (Clk, IO) w5.12: v1(3775.22,2410.78) 3775.22,2411.22 3807.25,2443.25 3807.38,2443.25 3822.94,2458.81 3874.14,2458.81 3889.7,2443.25 3917.2,2443.25 3948.72,2474.76 4232.8,2474.76 4244,2463.56 4244,2455 4236,2447 4234,2447 v1(4188,2401)
DRAM_DATA12: DRAM.A7 MCIMX6Y2DVM08AB.P5 | length 1067.2
  USB 2.0 (90 Diff) DDR3 Data (50-100) w5.12: MCIMX6Y2DVM08AB.P5@3728.23,2363.97 3728.41,2363.97 3741.06,2376.61 v1(3741.24,2376.61) ; DRAM.A7@4360.37,2479.7 v1(4382.45,2494.88)
  DDR3 Fly-by Routing (Address, Command, Control), QSPI Flash (Clk, IO) w5.12: v1(3741.24,2376.61) 3721.31,2376.61 3714.54,2383.38 3656.54,2383.38 3625.12,2414.8 3625.12,2465.88 3738.4,2579.16 4298.17,2579.16 v1(4382.45,2494.88)
DRAM_DATA13: DRAM.A2 MCIMX6Y2DVM08AB.P3 | length 469.8
  USB 2.0 (90 Diff) DDR3 Data (50-100) w5.12: MCIMX6Y2DVM08AB.P3@3791.22,2363.97 3793.62,2363.97 3805.11,2352.48 v1(3806.97,2352.48) ; v1(4187,2462.2) 4187,2463.01 4201,2477.01 4201,2477.81 DRAM.A2@4202.89,2479.7
  DDR3 Fly-by Routing (Address, Command, Control), QSPI Flash (Clk, IO) w5.12: v1(3806.97,2352.48) 3808.83,2352.48 3813.23,2356.88 3815.88,2356.88 3881,2422 4141.54,2422 ccw(c4141.54,2427.12) 4145.16,2423.5 4173.95,2452.29 4177.09,2452.29 v1(4187,2462.2)
DRAM_DATA14: DRAM.B8 MCIMX6Y2DVM08AB.R2 | length 1296.3
  USB 2.0 (90 Diff) DDR3 Data (50-100) w5.12: MCIMX6Y2DVM08AB.R2@3822.72,2395.46 3822.72,2395.59 3826.58,2399.46 ccw(c3822.97,2403.08) 3826.88,2399.78 3837.12,2411.88 v1(3835.21,2413.79) ; DRAM.B8@4391.87,2448.2 4392.04,2448.2 4399.35,2455.52 cw(c4402.97,2451.91) 4399.52,2455.69 v1(4411.35,2466.48)
  DDR3 Fly-by Routing (Address, Command, Control), QSPI Flash (Clk, IO) w5.12: v1(3835.21,2413.79) 3812.54,2413.79 3762.8,2364.05 3737.95,2364.05 3733.22,2368.78 3719.07,2368.78 3714.79,2373.06 3655.94,2373.06 3616,2413 3616,2511.1 3688.32,2583.42 3732.59,2583.42 3735.45,2586.28 4309.72,2586.28 4411.35,2484.65 v1(4411.35,2466.48)
DRAM_DATA15: DRAM.A3 MCIMX6Y2DVM08AB.R1 | length 417.8
  USB 2.0 (90 Diff) DDR3 Data (50-100) w5.12: MCIMX6Y2DVM08AB.R1@3854.21,2395.46 3855.19,2395.46 3868.72,2409 v1(3887,2409) ; v1(4219,2462.2) 4219,2463.26 4234.39,2478.65 DRAM.A3@4234.39,2479.7
  DDR3 Fly-by Routing (Address, Command, Control), QSPI Flash (Clk, IO) w5.12: v1(3887,2409) 4160.34,2409 4162.17,2407.17 4217.2,2462.2 v1(4219,2462.2)
DRAM_SDQ0_N: C46.2 C47.2 DRAM.G3 MCIMX6Y2DVM08AB.P7 | length 1515
  USB 2.0 (90 Diff) DDR3 Data (50-100) w5.12: MCIMX6Y2DVM08AB.P7@3665.24,2363.97 3665.24,2363.87 3680,2349.1 v1(3680,2349) ; C47.2@4207.12,2570.26 C46.2@4207.12,2628.26 4207.12,2631.21 4174.19,2664.14 4174.09,2664.14 4152,2686.24 v1(4152,2688) 4152,2708.24 4164.22,2720.46 4213.78,2720.46 4295.12,2639.12 4295.12,2340.22 4268,2313.1 4256.76,2313.1 DRAM.G3@4234.39,2290.72
  Int6 eMMC High-Speed Data Lines (8-bit bus), SDIO/peripherals w5.12: v1(3680,2349) 3648.56,2380.44 3648.56,2388.2 3622.12,2414.64 3622.12,2441.12 3693.97,2512.97 4015.97,2512.97 4152,2649 v1(4152,2688)
DRAM_SDQ0_P: C46.1 C47.1 DRAM.F3 MCIMX6Y2DVM08AB.P6 | length 1541.9
  USB 2.0 (90 Diff) DDR3 Data (50-100) w5.12: MCIMX6Y2DVM08AB.P6@3696.73,2363.97 3700.39,2363.97 3699.81,2363.39 3699.81,2360.88 v1(3712.8,2347.88) ; DRAM.F3@4234.39,2322.22 4264.22,2322.22 4286,2344 4286,2635.34 4210,2711.34 4168,2711.34 v1(4168,2688) 4189.13,2688 4242.16,2634.98 4242.16,2585.42 4244.58,2583 4266.57,2583 C47.1@4254.36,2570.8
  Int6 eMMC High-Speed Data Lines (8-bit bus), SDIO/peripherals w5.12: v1(3712.8,2347.88) 3702.48,2358.2 3702.48,2360.52 3693.73,2369.27 3669.8,2369.27 3655.68,2383.39 3655.68,2391.15 3634.69,2412.13 3634.69,2443.63 3657.51,2466.44 3866.59,2466.44 3904,2503.85 4029.48,2503.85 4168,2642.37 v1(4168,2688)
DRAM_SDQS1_N: C48.2 C49.2 DRAM.B7 MCIMX6Y2DVM08AB.T2 | length 1080.6
  USB 2.0 (90 Diff) DDR3 Data (50-100) w4: MCIMX6Y2DVM08AB.T2@3823.34,2426.96 MCIMX6Y2DVM08AB.T2@3822.72,2426.96 3840.76,2445 3938.03,2445 3946.03,2453 v1(3947,2453) ; DRAM.B7@4360.37,2448.2 4345.64,2448.2 4328.79,2465.05 4328.79,2481.89 4366.48,2519.58 C48.2@4366.48,2568.98 C49.2@4366.48,2626.74 ; C49.2@4366.24,2626.98 C49.2@4366.48,2626.74 ; v1(4421.16,2550.84) 4420.47,2550.16 4404.87,2550.16 4379,2576.03 4379,2614.22 C49.2@4366.48,2626.74
  Int6 eMMC High-Speed Data Lines (8-bit bus), SDIO/peripherals w4: v1(3947,2453) 3929.93,2453 3927.93,2451 3913.03,2451 3897,2467.03 3897,2472.66 3911.64,2487.29 4351.95,2487.29 4403.83,2539.17 4409.49,2539.17 v1(4421.16,2550.84)
DRAM_SDQS1_P: C48.1 C49.1 DRAM.C7 MCIMX6Y2DVM08AB.T1 | length 1147.9
  USB 2.0 (90 Diff) DDR3 Data (50-100) w4: MCIMX6Y2DVM08AB.T1@3854.21,2427.09 MCIMX6Y2DVM08AB.T1@3854.21,2426.96 3855.98,2426.96 3866.02,2437 v1(3947,2437) ; DRAM.C7@4360.37,2416.71 4320.79,2456.28 4320.79,2567.43 C48.1@4319.24,2568.98 4319.24,2626.74 C49.1@4318.99,2626.98 4339.76,2626.98 4344.37,2631.6 4344.37,2646.09 4348.99,2650.7 4383.49,2650.7 4409.84,2624.34 v1(4409.84,2562.16)
  Int6 eMMC High-Speed Data Lines (8-bit bus), SDIO/peripherals w4: v1(3947,2437) 3915.72,2437 3898.01,2454.7 3889,2463.72 3889,2475.97 3908.32,2495.29 4348.64,2495.29 4398.17,2544.83 4398.17,2550.49 v1(4409.84,2562.16)
DRAM_VREF: C45.1 C148.1 C150.2 MCIMX6Y2DVM08AB.P4 pad.43 R168.1 R169.2 | length 4424.2
  USB 2.0 (90 Diff) DDR3 Data (50-100) w5: v1(3632,2497) 3621.96,2486.96 3621.96,2453.58 3628.86,2446.67 3638.62,2446.67 3644.05,2452.1 3652.75,2452.1 3658.18,2446.67 3662.19,2446.67 3677.02,2431.84 3677.02,2430.01 3697.37,2409.66 3699.2,2409.66 3714.86,2394 3714.86,2360.68 3723.35,2352.18 3734.35,2352.18 3744.94,2362.78 3758.53,2362.78 MCIMX6Y2DVM08AB.P4@3759.72,2363.97
  USB 2.0 (90 Diff) DDR3 Data (50-100) w25: C150.2@449,2673.53 516.35,2673.53 R169.2@517,2672.87 C148.1@588,2672.87 ; C148.1@588,2672.53 593.22,2672.53 639,2672.53 ccw(c639,2698.48) 655.72,2678.63 ccw(c639,2698.48) R168.1@659.06,2682 659.46,2682 681.96,2704.51 681.96,2708.08 690.46,2716.58 896.42,2716.58 v1(938,2675) ; C45.1@2891,2533.47 2892.53,2535 v1(2959,2535)
  USB 2.0 (90 Diff) DDR3 Data (50-100) w50: v1(1912,3207) 2048,3071 2879,3071 v1(2960,2990)
  Int4 PWR w25: v1(2959,2535) 2994,2535 3011,2518 3570.43,2518 3591.43,2497 v1(3632,2497)
  Int4 PWR w50: v1(938,2675) 1072,2809 1072,2973 1306,3207 v1(1912,3207) ; v1(2959,2535) 2960,2536 v1(2960,2990)
EMMC_DATA0: EMMC.A3 MCIMX6Y2DVM08AB.D7 R62.2 | length 3296.9
  USB 2.0 (90 Diff) DDR3 Data (50-100) w5.12: EMMC.A3@2440.97,1944.17 2440.97,1943.03 2442,1942 2443.14,1942 2452.42,1932.72 2485.09,1932.72 2485.26,1932.9 2488.09,1932.9 2500,1944.81 v1(2500,2051) ; v1(2446,1771) 2446,1723.82 R62.2@2447.12,1722.7 ; v1(3650,2034) 3650.11,2034 3665.12,2049.01 MCIMX6Y2DVM08AB.D7@3665.24,2049.01
  DDR3 Fly-by Routing (Address, Command, Control), QSPI Flash (Clk, IO) w5.12: v1(2446,1771) 2480.02,1805.02 2641.74,1805.02 2665,1781.76 2665,1711 2648.25,1694.25 2487.75,1694.25 2471.02,1710.98 2108.02,1710.98 2016,1803 2016,1873 2042.58,1899.58 2081.42,1899.58 2224.44,2042.59 2344.45,2042.59 2384,2082.15 2384,2144.58 2387.31,2147.88 2435.88,2147.88 2500,2083.76 ; v1(2500,2051) 2500,2083.76 ; v1(3650,2034) 3649.38,2033.38 3635.94,2033.38 3624,2021.44 3601.83,2021.44 3571.21,2052.05 3542.18,2052.05 3504.05,2090.18 3364.33,2090.18 3345.95,2108.56 3322.51,2108.56 3312.63,2118.44 3181.07,2118.44 3164.09,2101.46 2657.15,2101.46 2602.06,2156.56 2543,2156.56 2500,2113.56 2500,2083.76
EMMC_DATA1: EMMC.A4 MCIMX6Y2DVM08AB.B7 R61.2 | length 1619.6
  USB 2.0 (90 Diff) DDR3 Data (50-100) w4: R61.2@2287.12,1721.76 2286,1722.87 v1(2286,1771) 2302.97,1771 2443.3,1911.33 2443.3,1922.16 ; EMMC.A4@2421.29,1944.17 2443.3,1922.16 ; v1(2487,1922.34) 2486.82,1922.16 2443.3,1922.16 ; v1(3647,1970) 3648.11,1970 3664.13,1986.02 MCIMX6Y2DVM08AB.B7@3665.24,1986.02 MCIMX6Y2DVM08AB.B7@3665.61,1986.02
  DDR3 Fly-by Routing (Address, Command, Control), QSPI Flash (Clk, IO) w4: v1(2487,1922.34) 2487.66,1923 2504,1923 2614.84,2033.84 3116.61,2033.84 3154.97,1995.48 3450.49,1995.48 3489.11,1956.86 3561.49,1956.86 3561.63,1957 3634,1957 v1(3647,1970)
EMMC_DATA2: EMMC.A5 MCIMX6Y2DVM08AB.A7 R60.2 | length 1747
  USB 2.0 (90 Diff) DDR3 Data (50-100) w4: R60.2@2207.12,1721.76 2208,1722.64 v1(2208,1773) 2230.43,1773 EMMC.A5@2401.6,1944.17 2401.6,1917.4 v1(2417,1902) ; v1(3654,1929) 3664.07,1939.07 3664.07,1953.35 MCIMX6Y2DVM08AB.A7@3665.24,1954.52 3663.48,1954.52 3664.36,1953.64 MCIMX6Y2DVM08AB.A7@3665.24,1952.76
  DDR3 Fly-by Routing (Address, Command, Control), QSPI Flash (Clk, IO) w4: v1(2417,1902) 2511.28,1902 2627.13,2017.84 3109.98,2017.84 3181.42,1946.4 ; 3386.96,1959.92 3405.67,1959.92 ; 3429.02,1944.67 3432.83,1940.86 3552.91,1940.86 3562.87,1930.9 3607.55,1930.9 3614.45,1924 3641.14,1924 3644.61,1927.47 3652.47,1927.47 v1(3654,1929)
  DDR3 Fly-by Routing (Address, Command, Control), QSPI Flash (Clk, IO) w5: 3181.42,1946.4 3194.45,1933.37 3360.41,1933.37 3386.96,1959.92 ; 3405.67,1959.92 3413.77,1959.92 3429.02,1944.67
EMMC_DATA3: EMMC.B2 MCIMX6Y2DVM08AB.D6 R59.2 | length 2839.9
  USB 2.0 (90 Diff) DDR3 Data (50-100) w4.92: EMMC.B2@2460.66,1963.85 v1(2461.68,1964.68) ; v1(2607,1770) 2607,1721.87 R59.2@2607.12,1721.76 ; v1(3681,2065) 3681,2064.87 3696.73,2049.14 MCIMX6Y2DVM08AB.D6@3696.73,2049.01 MCIMX6Y2DVM08AB.D6@3696.73,2048.87
  DDR3 Fly-by Routing (Address, Command, Control), QSPI Flash (Clk, IO) w4.92: 2447.82,1977.87 2442.09,1983.59 2442.09,2008.23 2436.32,2014 2411,2014 2400,2003 2253,2003 2090.62,1840.62 2090.62,1769.06 2117.14,1742.54 2619.5,1742.54 2645.46,1768.5 2655.47,1778.53 2638,1796 2531.38,1796 2510,1774.62 2510,1763.42 2512.88,1760.54 2553.54,1760.54 2563,1770 v1(2607,1770) ; 2447.84,1977.84 ccw(c2451.3,1981.35) 2447.88,1977.81 v1(2461.68,1964.68) 2477.31,1965.35 cw(c2477.52,1960.43) 2477.52,1965.35 2498.91,1965.35 2624,2090.45 3163,2090.45 3183.97,2111.42 3298.39,2111.42 3326.65,2083.16 3501.14,2083.16 3540.3,2044 3561.62,2044 3593.2,2012.42 3633.18,2012.42 3635.22,2014.46 3648.08,2014.46 3662.46,2028.84 3662.46,2046.46 v1(3681,2065)
EMMC_DATA4: EMMC.B3 MCIMX6Y2DVM08AB.C6 R58.2 | length 2627.4
  USB 2.0 (90 Diff) DDR3 Data (50-100) w4: v1(2526,1773) 2526,1723.35 R58.2@2527.12,1722.23 ; v1(3682,2033) 3682,2032.62 3696.12,2018.5 3696.12,2017.51 MCIMX6Y2DVM08AB.C6@3696.73,2017.51
  DDR3 Fly-by Routing (Address, Command, Control), QSPI Flash (Clk, IO) w4: v1(2526,1773) 2535,1782 2627,1782 2637,1772 2616,1751 2120.64,1751 2107.72,1763.92 2107.72,1764 2099.08,1772.64 2099.08,1835.98 2258.05,1994.95 2402.36,1994.95 2412.4,2004.99 2428.55,2004.99 2435.32,1998.22 2435.32,1969.51 v1(2440.97,1963.85) 2452.83,1952 2498.41,1952 2612.55,2066.13 3136.26,2066.13 3147.39,2055 3261.57,2055 3283.27,2076.7 3498.47,2076.7 3528.04,2047.12 3528.04,2045.82 3557.62,2016.24 3557.62,2015.24 3582.86,1990 3653.97,1990 3682,2018.03 v1(3682,2033)
EMMC_DATA5: EMMC.B4 MCIMX6Y2DVM08AB.B6 R57.2 | length 2189.4
  USB 2.0 (90 Diff) DDR3 Data (50-100) w4: R57.2@2367.12,1721.76 2368,1722.64 v1(2368,1772) ; v1(3685.24,1970.27) 3685.24,1972.4 3696.73,1983.89 MCIMX6Y2DVM08AB.B6@3696.73,1986.02
  DDR3 Fly-by Routing (Address, Command, Control), QSPI Flash (Clk, IO) w4: v1(2368,1772) 2355,1759 2124.03,1759 2107.08,1775.95 2107.08,1832.67 2259.19,1984.78 2331.21,1984.78 2335.39,1988.95 2396.19,1988.95 v1(2421.29,1963.85) 2421.29,1921.71 2432,1911 2508.97,1911 2623.81,2025.84 3113.29,2025.84 3151.66,1987.48 3424.15,1987.48 3462.77,1948.86 3633.73,1948.86 3633.87,1949 3660,1949 3673.36,1962.36 3676.19,1962.36 3684.1,1970.27 v1(3685.24,1970.27)
EMMC_DATA6: EMMC.B5 MCIMX6Y2DVM08AB.A6 R56.2 | length 1949.1
  USB 2.0 (90 Diff) DDR3 Data (50-100) w4.92: R56.2@2127.12,1722.23 2128,1723.11 v1(2128,1772) ; v1(3694.94,1928) 3695.84,1928.89 3695.84,1953.63 MCIMX6Y2DVM08AB.A6@3696.73,1954.52
  DDR3 Fly-by Routing (Address, Command, Control), QSPI Flash (Clk, IO) w4.92: v1(2128,1772) 2115.54,1784.46 2115.54,1829.16 2262.69,1976.32 2389.14,1976.32 v1(2401.6,1963.85) 2401.6,1899.78 2411.84,1889.54 2510.79,1889.54 2630.63,2009.38 3106.47,2009.38 3193.79,1922.07 3604.42,1922.07 3610.95,1915.54 3682.48,1915.54 v1(3694.94,1928) v1@3694.94,1926.08
EMMC_DATA7: EMMC.B6 MCIMX6Y2DVM08AB.A5 R55.2 | length 2023.6
  USB 2.0 (90 Diff) DDR3 Data (50-100) w4: R55.2@2047.12,1721.76 2047.12,1743.12 v1(2128,1824) ; MCIMX6Y2DVM08AB.A5@3728.23,1954.52 3727.85,1954.52 3728.61,1953.76 3728.61,1930.39 v1(3729,1930)
  DDR3 Fly-by Routing (Address, Command, Control), QSPI Flash (Clk, IO) w4: v1(2128,1824) 2211.5,1907.5 2381.92,1907.5 2395.13,1894.29 ; v1(2381.92,1963.85) 2384.08,1963.85 2390.75,1957.19 2392.5,1957.19 2395.13,1954.56 2395.13,1894.29 ; v1(3729,1930) 3657,1858 3189.16,1858 3046.24,2000.92 2634.14,2000.92 2514.29,1881.08 2408.33,1881.08 2395.13,1894.29